# Altium PCB Thunderbolt3.pcbdoc (part 4 of 5)
Units mm, origin at the board's own origin, x right, y up, seen from the top; angles counter-clockwise.
Board outline 43.92 x 41.77 mm, 6 copper layers (TopLayer, MidLayer1, MidLayer2, MidLayer3, MidLayer4, BottomLayer); 211 components, 193 nets, 1132 pads, 744 vias.
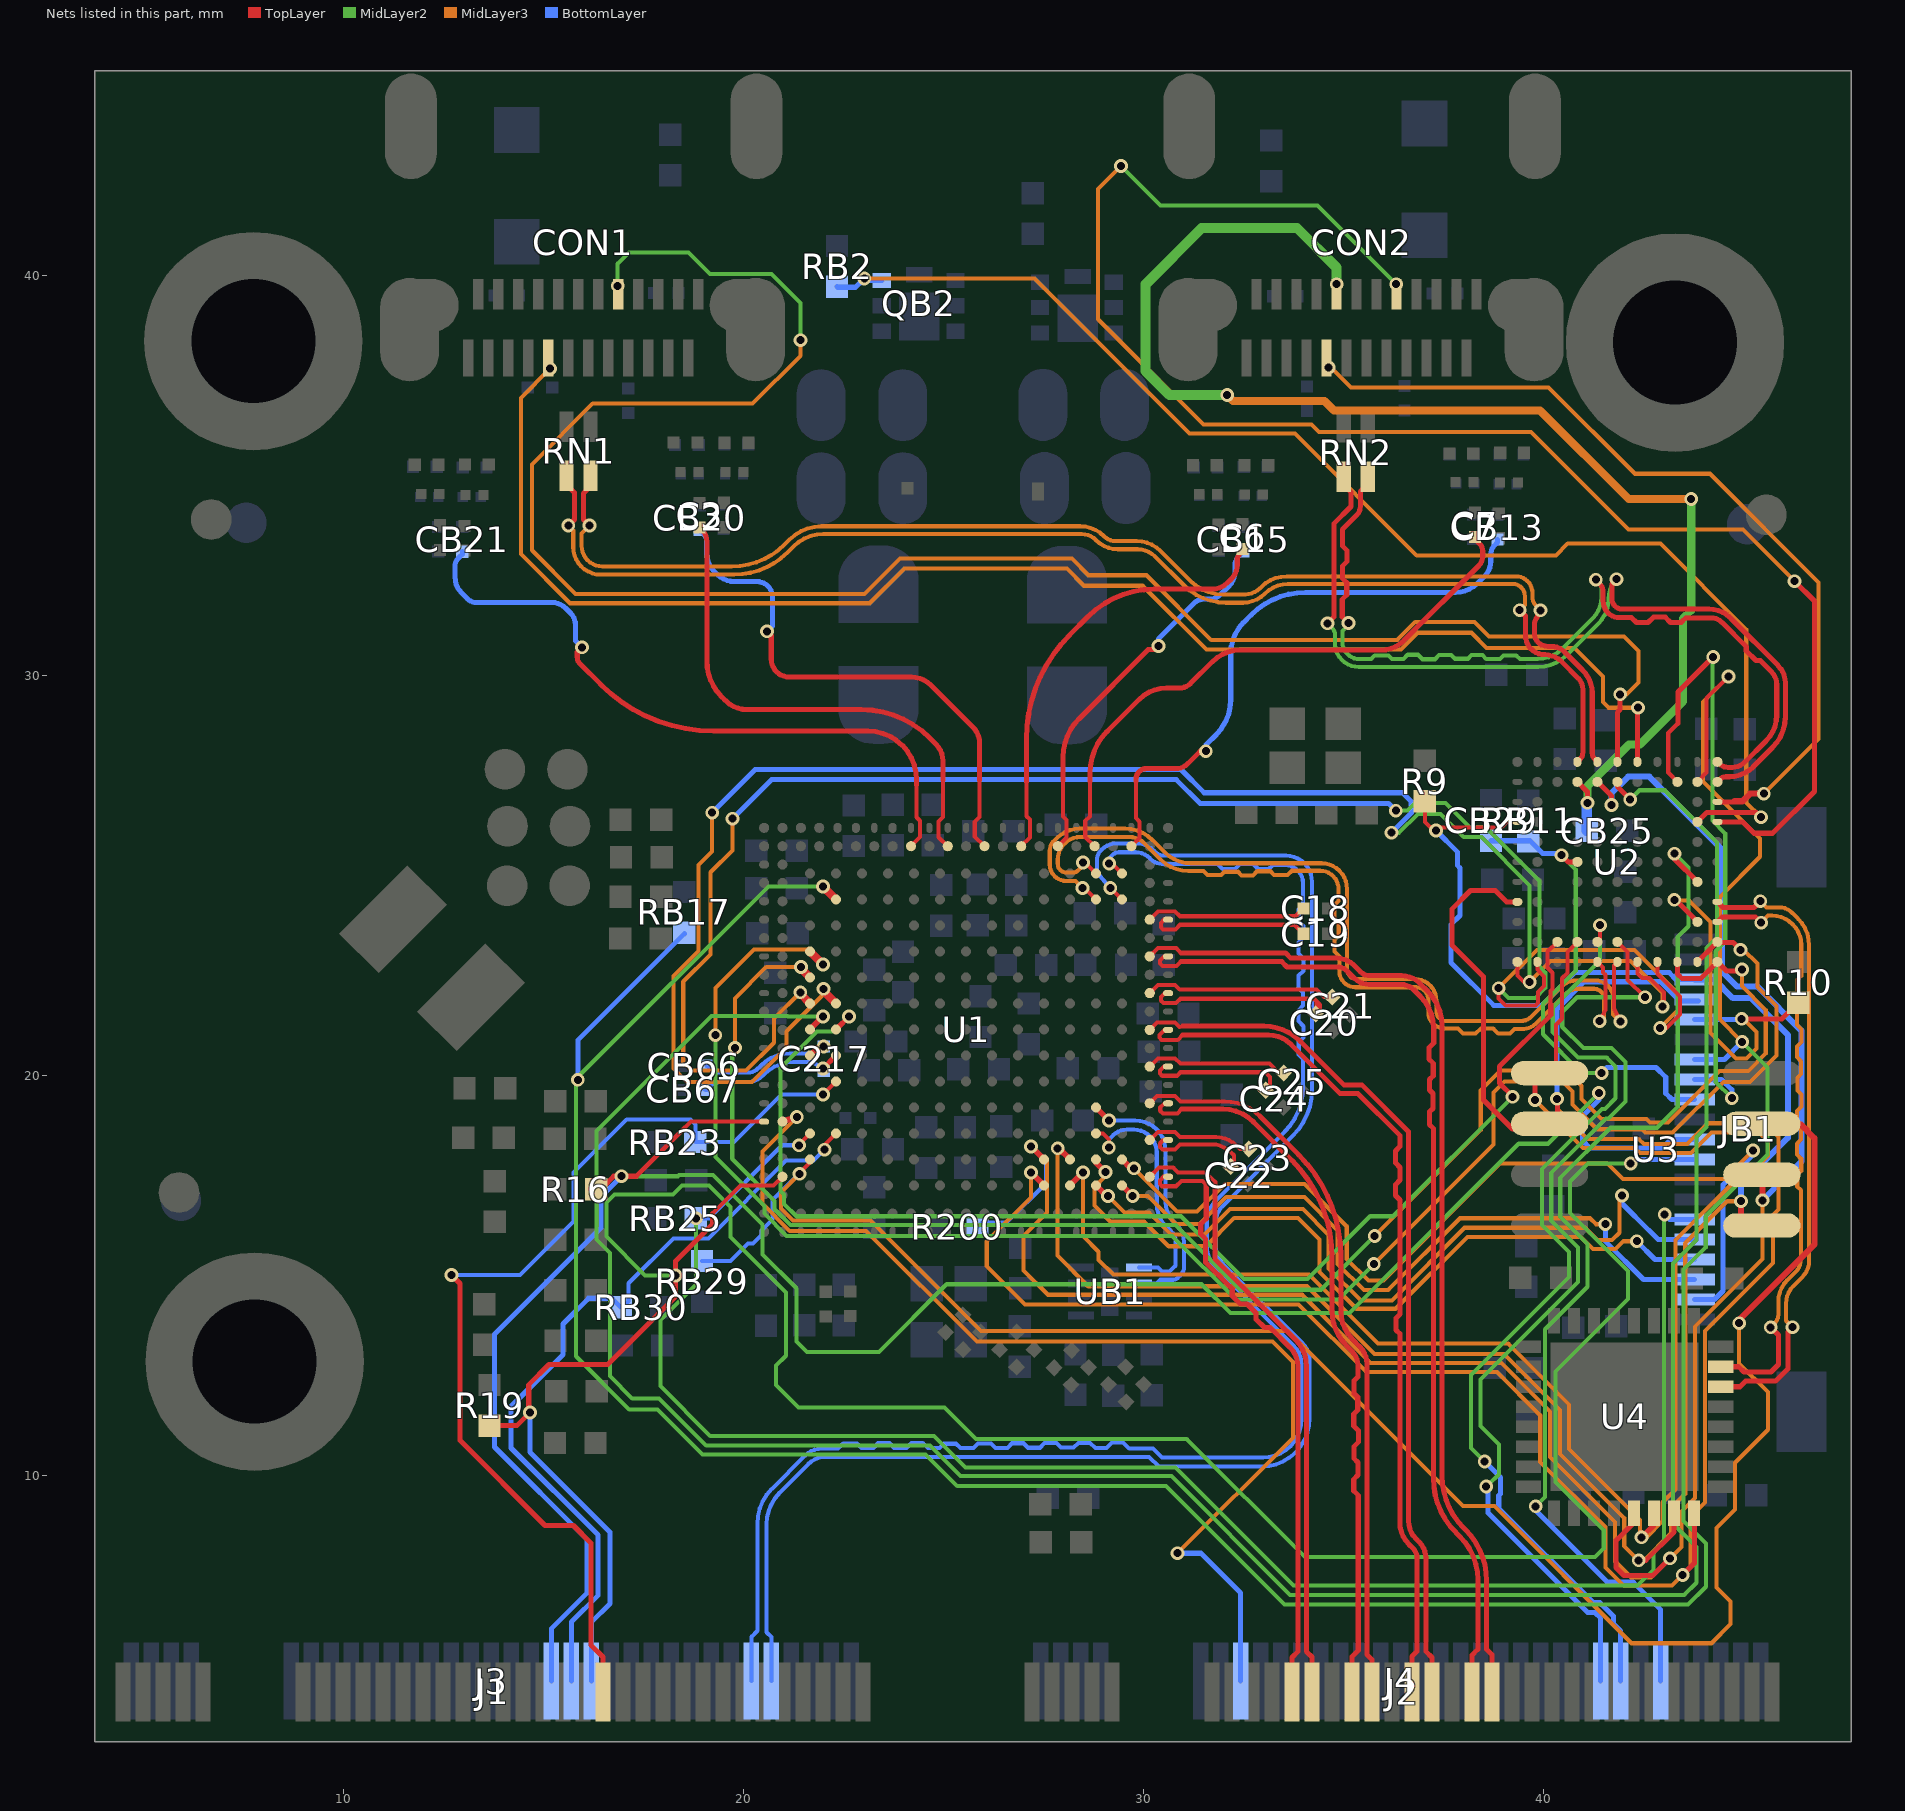
[diagram p8: the nets of this part, all layers, seen from the top]

## Via types
v1: diameter 0.343, hole 0.2, TopLayer to BottomLayer, tented both sides, 632 vias
v2: diameter 0.8, hole 0.8, TopLayer to BottomLayer, 112 vias

## Nets (pads, with @x,y where several pads share a name; then routed paths per layer and width w, separated by ;. In a path a pad name is that pad's centre, name@x,y a point inside that pad or via, vN(x,y) a via of type N, cw(c..) or ccw(c..) an arc to the next point about the centre after c; other vN are vias at no path point) (continued)
U1-B9: CB21.1 U1.B9 | length 16.9
  TopLayer w0.102: U1.B9@24.183,25.742 24.41,25.969 24.41,26.378 24.323,26.465 24.323,27.273
  TopLayer w0.127: v1(15.958,30.713) 15.838,30.594 15.838,30.471 ccw(c16.073,30.471) 15.907,30.305 16.424,29.788 ccw(c19.243,32.607) 19.243,28.62 23.1,28.62 cw(c23.1,27.398) 24.323,27.398 24.323,27.273
  BottomLayer w0.127: CB21.1@12.965,33.103 12.965,33.04 12.871,32.945 ccw(c13.082,32.734) 12.783,32.734 12.783,32.468 ccw(c13.338,32.468) 12.946,32.075 13.094,31.927 ccw(c13.316,32.149) 13.316,31.835 15.206,31.835 cw(c15.206,31.358) 15.543,31.696 15.68,31.558 cw(c15.407,31.285) 15.793,31.285 15.793,30.878 v1(15.958,30.713)
U1-B11: C3.1 U1.B11 | length 12.8
  TopLayer w0.102: 24.98,27.398 24.98,26.468 24.87,26.358 24.87,25.965 25.094,25.742 U1.B11@25.101,25.742
  TopLayer w0.127: C3.1@18.898,33.706 18.961,33.642 cw(c18.679,33.36) 19.078,33.36 19.078,30.373 ccw(c20.345,30.373) 19.449,29.476 19.546,29.38 ccw(c20.088,29.922) 20.088,29.155 22.948,29.155 cw(c22.948,26.752) 24.647,28.451 24.809,28.289 cw(c24.395,27.875) 24.98,27.875 24.98,27.398
U1-B13: CB20.1 U1.B13 | length 13.5
  TopLayer w0.102: 25.898,27.38 25.898,26.468 25.775,26.345 25.775,25.985 U1.B13@26.019,25.742
  TopLayer w0.127: v1(20.583,31.113) 20.688,31.008 20.688,30.423 ccw(c21.14,30.423) 21.14,29.97 24.19,29.97 cw(c24.19,29.275) 24.682,29.766 25.732,28.716 cw(c25.331,28.315) 25.898,28.315 25.898,27.38
  BottomLayer w0.127: CB20.1@18.903,33.643 19.004,33.542 cw(c18.842,33.38) 19.071,33.38 19.071,33.08 ccw(c19.741,33.08) 19.267,32.606 19.335,32.538 ccw(c19.771,32.973) 19.771,32.358 20.331,32.358 cw(c20.331,31.97) 20.718,31.97 20.718,31.249 v1(20.583,31.113)
U1-B15: C6.1 U1.B15 | length 11
  TopLayer w0.102: U1.B15@26.937,25.742 27.153,25.957 27.153,26.408 27.07,26.49 27.07,27.353
  TopLayer w0.127: 27.07,27.353 27.07,28.43 cw(c30.725,28.43) 28.141,31.015 28.609,31.482 cw(c30.263,29.828) 30.263,32.168 31.714,32.168 ccw(c31.714,32.704) 32.093,32.325 32.192,32.423 ccw(c31.84,32.775) 32.338,32.775 32.338,32.948 C6.1@32.473,33.173
U1-B17: CB15.1 U1.B17 | length 9.7
  TopLayer w0.102: U1.B17@27.856,25.742 28.07,25.956 28.07,26.4 27.985,26.485 27.985,27.453
  TopLayer w0.127: 27.985,27.39 27.985,27.972 cw(c29.332,27.972) 28.38,28.923 30.115,30.658 30.28,30.658 v1(30.368,30.746)
  BottomLayer w0.127: v1(30.368,30.746) 30.368,30.925 31.269,31.826 cw(c31.491,31.604) 31.491,31.918 31.654,31.918 ccw(c31.654,32.272) 31.904,32.021 32.143,32.26 ccw(c31.81,32.593) 32.281,32.593 32.281,32.743 cw(c32.673,32.743) 32.396,33.02 CB15.1@32.488,33.113
U1-B19: C7.1 U1.B19 | length 14.9
  TopLayer w0.102: 28.653,27.483 28.653,26.485 28.538,26.37 28.538,25.977 U1.B19@28.774,25.742
  TopLayer w0.127: 28.653,27.355 28.653,27.563 cw(c30.138,27.563) 29.088,28.613 29.888,29.412 cw(c30.57,28.73) 30.57,29.695 30.889,29.695 ccw(c30.889,30.096) 31.173,29.813 31.711,30.351 cw(c32.415,29.647) 32.415,30.643 35.934,30.643 ccw(c35.934,31.437) 36.495,30.875 38.382,32.761 ccw(c38.155,32.988) 38.475,32.988 38.475,33.118 ccw(c38.211,33.118) 38.398,33.305 C7.1@38.308,33.395
U1-B21: CB13.1 U1.B21 | length 14.8
  TopLayer w0.102: U1.B21@29.692,25.742 29.9,25.95 29.9,26.353 29.81,26.443 29.81,27.365
  TopLayer w0.127: 29.81,27.365 29.81,27.425 cw(c30.065,27.425) 30.065,27.68 30.803,27.68 ccw(c30.803,28.103) 31.102,27.804 31.413,28.116 v1(31.553,28.116)
  BottomLayer w0.127: v1@31.563,28.105 31.563,28.281 31.817,28.536 ccw(c30.953,29.4) 32.176,29.4 32.176,30.557 cw(c33.277,30.557) 32.498,31.335 32.69,31.527 cw(c34.043,30.174) 34.043,32.088 37.8,32.088 ccw(c37.8,32.856) 38.343,32.313 38.525,32.495 ccw(c38.163,32.858) 38.676,32.858 38.676,33.043 cw(c38.97,33.043) 38.762,33.251 38.843,33.332 CB13.1@38.843,33.405
U1-D19: U1.D19 U2.G11 | length 22.2
  TopLayer w0.102: v1@28.535,25.333 U1.D19@28.808,25.06 ; U2.G11@41.343,22.851 41.483,22.71 41.483,22.585 41.54,22.528 41.54,21.65 v1(41.398,21.366)
  MidLayer3 w0.102: v1(28.48,25.333) 28.48,25.26 28.347,25.126 cw(c28.247,25.226) 28.247,25.085 28.056,25.085 cw(c28.056,25.278) 27.919,25.142 27.916,25.145 cw(c28.073,25.302) 27.851,25.302 27.851,25.4 cw(c28.423,25.4) 28.423,25.973 29.628,25.973 cw(c29.628,25.417) 30.021,25.81 30.422,25.408 ccw(c31.118,26.104) 31.118,25.12 31.493,25.12 31.593,25.02 31.938,25.02 32.021,25.103 32.353,25.103 32.446,25.01 32.733,25.01 32.838,25.115 33.166,25.115 33.261,25.02 33.598,25.02 33.706,25.128 34.408,25.128 cw(c34.408,24.663) 34.873,24.663 34.873,24.37 34.771,24.268 34.771,23.943 34.876,23.838 34.876,23.503 34.771,23.398 34.771,23.108 34.893,22.985 34.893,22.615 ccw(c35.293,22.615) 35.293,22.215 36.808,22.215 cw(c36.808,21.908) 37.116,21.908 37.116,21.595 ccw(c37.523,21.595) 37.523,21.188 37.856,21.188 37.986,21.058 38.298,21.058 38.428,21.188 38.738,21.188 38.863,21.063 39.161,21.063 39.273,21.175 39.508,21.175 ccw(c39.508,21.555) 39.777,21.286 40.518,22.027 cw(c40.881,21.665) 40.881,22.178 41.256,22.178 cw(c41.256,21.925) 41.508,21.925 41.508,21.476 v1(41.398,21.366)
U1-D20: J3.12 U1.D20 | length 41.8
  TopLayer w0.102: v1@29.21,25.308 U1.D20@29.458,25.06
  BottomLayer w0.102: J3.12@20.19,4.868 20.19,5.977 20.341,6.128 20.341,8.804 cw(c21.574,8.804) 20.702,9.676 21.53,10.504 cw(c21.961,10.073) 21.961,10.683 22.361,10.683 22.488,10.81 22.833,10.81 22.941,10.703 23.246,10.703 23.358,10.815 23.643,10.815 23.756,10.703 24.068,10.703 24.191,10.825 24.476,10.825 24.608,10.693 24.891,10.693 25.001,10.803 25.308,10.803 25.418,10.693 25.741,10.693 25.861,10.813 26.181,10.813 26.298,10.695 26.591,10.695 26.711,10.815 26.991,10.815 27.103,10.703 27.406,10.703 27.523,10.82 27.821,10.82 27.936,10.705 28.248,10.705 28.368,10.825 28.661,10.825 28.791,10.695 29.073,10.695 29.211,10.833 29.486,10.833 29.638,10.68 30.236,10.68 30.458,10.458 32.986,10.458 ccw(c32.986,11.418) 33.946,11.418 33.946,12.79 ccw(c33.306,12.79) 33.758,13.243 31.809,15.191 cw(c32.374,15.756) 31.576,15.756 31.576,16.298 cw(c32.438,16.298) 31.828,16.908 33.528,18.607 ccw(c32.422,19.713) 33.986,19.713 33.986,20.42 33.876,20.53 33.876,20.845 33.993,20.963 33.993,21.24 33.866,21.368 33.866,21.638 33.983,21.755 33.983,22.088 33.871,22.2 33.871,22.505 33.991,22.625 33.991,22.938 33.873,23.055 33.873,23.333 33.996,23.455 33.996,23.743 33.876,23.863 33.876,24.155 33.983,24.263 33.983,24.823 ccw(c33.538,24.823) 33.538,25.268 33.228,25.268 33.126,25.165 32.868,25.165 32.738,25.295 32.408,25.295 32.283,25.17 31.976,25.17 31.846,25.3 30.451,25.3 cw(c30.451,25.674) 30.186,25.41 30.157,25.439 ccw(c29.792,25.074) 29.792,25.59 29.381,25.59 ccw(c29.381,25.367) 29.223,25.525 29.135,25.437 v1(29.135,25.308)
U1-E5: JB1.14 RB17.2 U1.E5 U2.B2 | length 81.3
  TopLayer w0.102: U2.B2@43.843,27.351 44.075,27.583 44.075,29.441 v1(44.618,29.983)
  TopLayer w0.203: v1(21.983,24.735) U1.E5@22.308,24.41
  MidLayer2 w0.102: v1(21.983,24.735) 20.616,24.735 15.808,19.928 15.808,12.99 17.138,11.66 17.846,11.66 18.971,10.535 24.548,10.535 25.338,9.745 30.556,9.745 33.521,6.78 43.611,6.78 44.058,7.228 44.058,8.313 43.496,8.875 43.496,15.158 44.051,15.713 44.051,16.49 45.598,18.038 45.598,20.213 v1(44.96,20.851)
  MidLayer3 w0.102: v1(44.618,29.983) 43.983,29.349 43.983,27.36 45.411,25.933 45.411,25.478 44.403,24.47 44.403,21.408 v1(44.96,20.851)
  BottomLayer w0.127: v1(15.853,19.901) 15.853,20.89 RB17.2@18.515,23.552 ; JB1.14@43.773,20.411 44.52,20.411 v1(44.96,20.851)
U1-E19: U1.E19 U2.F11 | length 22.6
  TopLayer w0.102: v1@28.523,24.695 U1.E19@28.808,24.41 ; U2.F11@41.843,22.851 41.755,22.763 41.755,21.683 v1(41.918,21.358)
  MidLayer3 w0.102: v1(28.468,24.695) 28.29,24.873 28.061,24.873 cw(c28.061,25.283) 27.651,25.283 27.651,25.638 cw(c27.958,25.638) 27.741,25.855 27.829,25.943 cw(c28.401,25.371) 28.401,26.18 29.528,26.18 cw(c29.528,25.196) 30.224,25.892 30.528,25.587 ccw(c31.186,26.245) 31.186,25.315 34.441,25.315 cw(c34.441,24.673) 35.083,24.673 35.083,22.668 ccw(c35.333,22.668) 35.333,22.418 36.783,22.418 cw(c36.783,21.883) 37.318,21.883 37.318,21.61 ccw(c37.556,21.61) 37.556,21.373 39.431,21.373 ccw(c39.431,21.74) 39.691,21.48 40.435,22.224 ; 40.435,22.224 cw(c40.823,21.836) 40.823,22.385 41.283,22.385 cw(c41.283,21.93) 41.738,21.93 41.738,21.538 v1(41.918,21.358)
U1-E20: J3.10 U1.E20 | length 41.7
  TopLayer w0.102: v1@29.198,24.67 U1.E20@29.458,24.41
  BottomLayer w0.102: J3.10@20.69,4.868 20.69,5.973 20.573,6.09 20.573,8.79 cw(c21.696,8.79) 20.902,9.584 21.606,10.288 cw(c22.058,9.835) 22.058,10.475 30.136,10.475 30.381,10.23 32.938,10.23 ccw(c32.938,11.44) 34.148,11.44 34.148,12.865 ccw(c33.484,12.865) 33.954,13.335 31.976,15.313 cw(c32.404,15.741) 31.798,15.741 31.798,16.332 cw(c32.374,16.332) 31.967,16.739 33.733,18.505 ccw(c32.585,19.653) 34.208,19.653 34.208,24.85 ccw(c33.553,24.85) 33.553,25.505 30.513,25.505 cw(c30.513,25.837) 30.278,25.602 30.252,25.629 ccw(c29.808,25.185) 29.808,25.813 29.331,25.813 ccw(c29.331,25.27) 28.947,25.654 28.933,25.64 ccw(c29.187,25.387) 28.828,25.387 28.828,25.205 ccw(c29.141,25.205) 28.903,25.003 v1(29.165,24.695)
U1-F22: C18.1 U1.F22 | length 4.1
  TopLayer w0.102: U1.F22@30.151,23.905 30.359,24.113 30.783,24.113 30.905,23.99 33.797,23.99 C18.1@33.993,24.186
U1-F23: C19.1 U1.F23 | length 4.1
  TopLayer w0.102: U1.F23@30.61,23.905 30.508,23.905 30.428,23.825 30.428,23.715 30.481,23.663 30.79,23.663 30.905,23.778 33.768,23.778 C19.1@33.993,23.553
U1-H4: U1.H4 U2.A10 U2.B11 | length 45
  TopLayer w0.127: U2.B11@43.843,22.851 44.327,23.335 44.736,23.335 v1(44.92,23.151)
  TopLayer w0.203: U1.H4@21.658,23.11 v1(21.983,22.785)
  MidLayer2 w0.102: v1(19.29,21.016) 19.29,17.971 20.516,16.745 20.516,16.555 21.071,16 30.713,16 32.303,14.41 34.867,14.41 v1(35.753,15.296)
  MidLayer3 w0.102: v1(19.29,21.016) 19.29,22.2 20.253,23.163 21.605,23.163 v1(21.983,22.785) ; v1(35.753,15.296) 38.743,18.286 38.743,19.583 39.018,19.858 40.471,19.858 40.721,19.608 40.721,19.283 41.338,18.665 42.461,18.665 42.543,18.583 43.226,18.583 44.493,19.85 45.161,19.85 45.816,20.505 45.816,21.75 45.341,22.225 45.341,22.81 45,23.151 v1(44.92,23.151)
U1-H22: J2.29 U1.H22 | length 25.4
  TopLayer w0.102: U1.H22@30.151,22.987 30.357,23.193 30.813,23.193 30.93,23.075
  TopLayer w0.127: 30.93,23.075 33.544,23.075 33.677,22.943 34.833,22.943 cw(c34.833,22.356) 35.248,22.771 35.419,22.6 ccw(c35.648,22.828) 35.648,22.505 36.445,22.505 cw(c36.445,21.867) 36.896,22.318 37.106,22.108 cw(c36.251,21.253) 37.46,21.253 37.46,9.995 ccw(c39.286,9.995) 37.995,8.704 ; 37.995,8.704 38.042,8.657 cw(c36.76,7.375) 38.573,7.375 38.573,5.663 38.708,5.528 J2.29@38.708,4.598
U1-H23: J2.31 U1.H23 | length 25.3
  TopLayer w0.102: U1.H23@30.61,22.987 30.51,22.987 30.408,22.885 30.408,22.81 30.475,22.743 30.818,22.743 30.93,22.855
  TopLayer w0.127: 30.93,22.855 33.453,22.855 33.585,22.723 34.828,22.723 cw(c34.828,22.343) 35.097,22.611 35.273,22.435 ccw(c35.635,22.798) 35.635,22.285 36.439,22.285 cw(c36.439,21.854) 36.744,22.159 36.922,21.982 cw(c36.128,21.188) 37.25,21.188 37.25,20.82 37.133,20.703 37.133,20.418 37.238,20.313 37.238,20.003 37.143,19.908 37.143,19.645 37.23,19.558 37.23,19.185 37.148,19.103 37.148,18.78 37.24,18.688 37.24,9.943 ccw(c39.161,9.943) 37.803,8.585 37.907,8.481 cw(c36.832,7.405) 38.353,7.405 38.353,5.663 38.208,5.518 J2.31@38.208,4.598
U1-J4: U1.J4 U2.A11 U2.C11 | length 42.6
  TopLayer w0.127: U2.C11@43.343,22.851 43.343,22.548 43.453,22.438 43.93,22.438 U2.A11@44.343,22.851 44.57,22.623 v1@44.968,22.623
  TopLayer w0.203: v1@21.398,22.72 U1.J4@21.658,22.46
  MidLayer2 w0.102: v1(19.78,20.701) 19.713,20.634 19.713,17.928 20.773,16.868 20.773,16.665 21.168,16.27 30.801,16.27 32.418,14.653 34.43,14.653 v1(35.775,15.998)
  MidLayer3 w0.102: v1(19.78,20.701) 19.78,21.937 20.563,22.72 v1(21.431,22.72) ; v1(35.775,15.998) 38.426,18.649 38.426,19.633 38.926,20.133 40.568,20.133 40.948,19.753 40.948,19.425 41.451,18.923 42.566,18.923 42.658,18.83 43.103,18.83 44.393,20.12 45.116,20.12 45.551,20.555 45.551,21.65 44.958,22.243 v1(44.958,22.66)
U1-K22: C21.1 U1.K22 | length 4.8
  TopLayer w0.102: U1.K22@30.151,22.069 30.353,22.27 30.788,22.27 30.9,22.158 34.315,22.158 34.502,21.971 C21.1@34.71,21.971
U1-K23: C20.1 U1.K23 | length 4.9
  TopLayer w0.102: U1.K23@30.61,22.069 30.531,22.069 30.433,21.97 30.433,21.878 30.492,21.819 30.811,21.819 30.92,21.928 34.258,21.928 34.408,21.778 C20.1@34.408,21.545 ; C20.1@34.323,21.573 34.323,21.863
U1-L4: U1.L4 U2.D11 U2.K11 | length 48.1
  TopLayer w0.102: v1(38.873,22.193) 38.873,21.933 39.05,21.755 39.793,21.755 39.86,21.823 39.86,22.098 40.01,22.248 40.01,22.486 39.843,22.654 U2.K11@39.843,22.851 ; U2.D11@42.843,22.851 42.843,22.55 43.41,21.983 43.41,21.535 43.071,21.196 v1(42.913,21.196)
  TopLayer w0.203: v1@21.415,22.053 U1.L4@21.658,21.81
  MidLayer2 w0.102: v1(36.303,26.631) 36.596,26.631 36.786,26.82 37.541,26.82 38.141,26.22 38.548,26.22 39.896,24.873 39.896,22.728 40.038,22.585 40.038,22.198 39.791,21.95 39.116,21.95 v1(38.873,22.193)
  MidLayer3 w0.102: v1(19.718,26.428) 19.718,25.635 19.173,25.09 19.173,23.038 18.488,22.353 18.488,20.345 18.703,20.13 20.061,20.13 20.758,20.828 20.758,21.433 v1(21.415,22.09) ; v1(38.873,22.193) 39.83,23.15 42.266,23.15 43.358,22.058 43.358,21.641 v1(42.913,21.196)
  BottomLayer w0.127: v1(19.718,26.428) 20.695,27.405 30.813,27.405 31.406,26.813 36.121,26.813 v1(36.303,26.631)
U1-L5: U1.L5 U2.E11 U2.L11 | length 44.9
  TopLayer w0.102: U2.L11@39.343,22.851 39.343,22.508 39.505,22.346 v1(39.65,22.346) ; U2.E11@42.343,22.851 42.343,22.563 42.458,22.448 42.642,22.448 43.008,22.082 v1@43.008,21.708
  TopLayer w0.203: v1@21.983,22.135 U1.L5@22.308,21.81
  MidLayer2 w0.102: v1(36.193,26.078) 36.386,26.078 36.853,26.545 37.423,26.545 38.001,25.968 38.446,25.968 39.65,24.763 v1(39.65,22.346)
  MidLayer3 w0.102: v1(19.21,26.578) 19.21,25.61 18.873,25.273 18.873,23.12 18.246,22.493 18.246,20.183 18.581,19.848 20.211,19.848 21.071,20.708 21.071,21.115 21.996,22.04 v1(21.996,22.175) ; v1(39.65,22.346) 40.175,22.87 42.171,22.87 42.971,22.07 v1(42.971,21.73)
  BottomLayer w0.127: v1(19.21,26.578) 20.29,27.658 30.931,27.658 31.511,27.078 36.468,27.078 36.688,26.858 36.688,26.574 v1(36.193,26.078)
U1-M4: U1.M4 U2.F2 | length 65.7
  TopLayer w0.127: U2.F2@41.843,27.351 41.843,27.231 v1(42.163,26.911)
  TopLayer w0.152: U1.M4@21.658,21.16 v1(21.983,21.485)
  MidLayer2 w0.102: v1(21.983,21.485) 21.106,21.485 21.093,21.498 19.196,21.498 16.321,18.623 16.321,15.905 16.658,15.568 16.658,12.493 17.213,11.938 17.886,11.938 19.063,10.76 24.656,10.76 25.423,9.993 30.691,9.993 33.658,7.025 43.513,7.025 43.816,7.328 43.816,8.223 43.236,8.803 43.236,15.313 43.816,15.893 43.816,18.475 44.066,18.725 44.066,23.198 44.328,23.46 44.328,25.838 43.026,27.14 42.392,27.14 v1(42.163,26.911)
U1-M5: U1.M5 U2.J10 | length 31.8
  TopLayer w0.102: 40.175,21.788 40.175,22.125 40.22,22.17 40.22,22.578 40.095,22.703 40.095,23.103 U2.J10@40.343,23.351
  TopLayer w0.127: U1.M5@22.308,21.16 v1@22.665,21.518 ; v1@39.238,19.476 38.895,19.818 38.895,20.238 40.175,21.518 40.175,21.788
  MidLayer2 w0.102: v1(22.633,21.485) 22.258,21.11 21.836,21.11 20.918,20.193 20.918,17.123 21.011,17.03 21.011,16.795 21.316,16.49 30.936,16.49 32.508,14.918 34.091,14.918 35.663,16.49 36.232,16.49 v1(39.218,19.476)
U1-M22: J2.35 U1.M22 | length 21.8
  TopLayer w0.102: U1.M22@30.151,21.151 30.333,21.333 30.783,21.333 30.898,21.218 30.973,21.243
  TopLayer w0.127: 30.973,21.243 33.003,21.243 cw(c33.003,19.956) 33.913,20.866 35.004,19.775 35.452,19.775 36.623,18.604 36.623,8.866 ccw(c37.244,8.866) 36.805,8.427 36.889,8.342 cw(c36.495,7.948) 37.053,7.948 37.053,5.613 37.208,5.458 J2.35@37.208,4.598
U1-M23: J2.37 U1.M23 | length 21.8
  TopLayer w0.102: U1.M23@30.61,21.151 30.521,21.151 30.393,21.023 30.393,20.955 30.446,20.902 30.852,20.902 30.973,21.023
  TopLayer w0.127: 30.973,21.023 33.12,21.023 cw(c33.12,20.237) 33.675,20.793 34.913,19.555 35.36,19.555 36.403,18.513 36.403,18.233 36.293,18.123 36.293,17.828 36.41,17.71 36.41,17.395 36.293,17.278 36.293,17.01 36.408,16.895 36.408,14.043 36.308,13.943 36.308,13.648 36.403,13.553 36.403,8.847 ccw(c37.197,8.847) 36.635,8.285 36.732,8.189 cw(c36.489,7.945) 36.833,7.945 36.833,5.613 36.708,5.488 J2.37@36.708,4.598
U1-N4: C217.1 CB66.1 U1.N4 | length 3.6
  TopLayer w0.127: U1.N4@21.658,20.51 21.883,20.735 v1(22,20.735)
  BottomLayer w0.102: CB66.1@19.07,20.253 19.18,20.143 ccw(c19.326,20.288) 19.326,20.083 20.107,20.083 ccw(c20.107,20.441) 20.361,20.188 20.433,20.26 cw(c21.158,19.534) 21.158,20.56 21.663,20.56 ccw(c21.663,20.952) 21.94,20.675 v1(22,20.735)
U1-N5: C217.2 CB67.1 U1.N5 | length 3.6
  TopLayer w0.127: v1@21.975,20.095 21.975,20.178 U1.N5@22.308,20.51
  BottomLayer w0.102: CB67.1@19.038,19.648 19.083,19.648 19.202,19.767 cw(c19.386,19.583) 19.386,19.843 20.08,19.843 ccw(c20.08,20.406) 20.478,20.008 20.507,20.037 cw(c21.246,19.298) 21.246,20.343 21.641,20.343 cw(c21.641,20.035) C217.2@21.858,20.253
  other v1: 21.983,20.185
U1-P22: C25.1 U1.P22 | length 3.6
  TopLayer w0.102: U1.P22@30.151,20.232 30.356,20.438 30.785,20.438 30.915,20.308 33.14,20.308 33.372,20.076 C25.1@33.498,20.076
U1-P23: C24.1 U1.P23 | length 3.6
  TopLayer w0.102: U1.P23@30.61,20.232 30.505,20.232 30.408,20.135 30.408,20.058 30.463,20.002 30.828,20.002 30.915,20.09 33.043,20.09 33.163,19.97 33.163,19.756 C24.1@33.048,19.641
U1-R5: J1.27 RB23.2 U1.R5 | length 25.5
  TopLayer w0.102: v1(21.983,19.535) U1.R5@22.308,19.86
  TopLayer w0.127: v1(12.695,15.021) 12.905,14.81 12.905,10.888 15.035,8.758 15.743,8.758 16.178,8.323 16.178,5.773 16.48,5.47 J1.27@16.48,4.598
  BottomLayer w0.102: v1(12.695,15.021) 14.409,15.021 15.751,16.363 15.751,17.58 17.076,18.905 18.666,18.905 18.79,18.78 RB23.2@18.79,18.345 19.758,18.345 20.948,19.535 v1(21.983,19.535)
U1-T19: U1.T19 UB1.6 | length 6.7
  TopLayer w0.127: U1.T19@28.808,19.21 v1(29.133,18.885)
  BottomLayer w0.102: v1(29.133,18.885) 29.788,18.885 cw(c29.788,18.128) 30.546,18.128 30.546,16.844 ccw(c31.25,16.844) 30.752,16.346 30.836,16.262 cw(c30.426,15.853) 31.006,15.853 31.006,15.213 cw(c30.74,15.213) 30.928,15.025 30.86,14.958 cw(c30.728,15.09) 30.728,14.903 30.418,14.903 30.324,14.808 UB1.6@29.883,14.808
U1-T22: J2.41 U1.T22 | length 18.3
  TopLayer w0.102: U1.T22@30.151,19.314 30.332,19.495 30.788,19.495 30.923,19.36 32.021,19.36 cw(c32.021,18.103) 32.91,18.992
  TopLayer w0.127: 32.91,18.992 33.875,18.026 cw(c31.334,15.485) 34.928,15.485 34.928,14.116 ccw(c35.916,14.116) 35.217,13.417 35.404,13.231 cw(c34.971,12.798) 35.583,12.798 35.583,5.53 35.708,5.405 J2.41@35.708,4.598
U1-T23: J2.43 U1.T23 | length 18.3
  TopLayer w0.102: U1.T23@30.61,19.314 30.522,19.314 30.413,19.205 30.413,19.128 30.48,19.06 30.843,19.06 30.95,19.168
  TopLayer w0.127: 30.95,19.168 31.977,19.168 cw(c31.977,18.092) 32.738,18.853 33.704,17.887 cw(c31.28,15.463) 34.708,15.463 34.708,14.13 ccw(c35.95,14.13) 35.072,13.251 35.207,13.116 cw(c34.854,12.763) 35.353,12.763 35.353,12.473 35.26,12.38 35.26,12.06 35.35,11.97 35.35,11.645 35.25,11.545 35.25,11.248 35.365,11.133 35.365,10.843 35.253,10.73 35.253,10.438 35.358,10.333 35.358,10.02 35.25,9.913 35.25,9.625 35.363,9.513 35.363,5.635 35.208,5.48 J2.43@35.208,4.598
U1-U1: J3.32 JB1.10 R16.2 U1.U1 | length 55.1
  TopLayer w0.102: 18.515,18.693 18.678,18.855 U1.U1@20.51,18.855
  TopLayer w0.127: R16.2@16.47,17.21 16.751,17.491 17.313,17.491 18.515,18.693
  MidLayer2 w0.102: v1(16.943,17.491) 18.354,17.491 18.383,17.52 19.236,17.52 20.471,16.285 20.471,15.538 21.318,14.69 21.318,13.358 21.583,13.093 23.378,13.093 25.076,14.79 31.448,14.79 32.166,14.073 35.146,14.073 39.376,18.303 40.111,18.303 v1(41.378,19.57)
  BottomLayer w0.127: J3.32@15.19,4.868 15.19,6.177 16.088,7.075 16.088,8.4 13.768,10.72 13.768,13.538 16.431,16.2 16.431,16.979 v1(16.943,17.491) ; v1(41.378,19.57) 41.378,19.398 40.968,18.988 40.968,18.385 41.153,18.2 42.973,18.2 43.184,18.411 JB1.10@43.773,18.411
U1-U2: J4.54 U1.U2 | length 28
  TopLayer w0.152: U1.U2@20.969,18.855 v1(21.328,18.973)
  MidLayer3 w0.102: v1(21.328,18.973) 20.466,18.11 20.466,16.81 21.151,16.125 23.058,16.125 25.828,13.355 33.218,13.355 33.731,12.843 33.731,10.951 v1(30.845,8.066)
  BottomLayer w0.127: v1(30.845,8.066) 31.433,8.066 32.425,7.073 J4.54@32.425,4.868
U1-V4: JB1.6 RB25.2 U1.V4 | length 45.1
  TopLayer w0.102: v1@21.38,18.283 U1.V4@21.658,18.56
  MidLayer2 w0.102: v1(18.805,16.438) 18.805,14.785 17.921,13.9 17.921,12.243 19.163,11 24.756,11 25.543,10.213 30.791,10.213 33.748,7.255 42.346,7.255 42.741,7.65 42.741,8.093 43.011,8.363 v1@43.011,16.521
  BottomLayer w0.102: v1(18.805,16.438) 19.133,16.438 20.961,18.265 v1(21.38,18.265)
  BottomLayer w0.127: v1(43.025,16.536) 43.15,16.411 JB1.6@43.773,16.411
U1-V5: J3.30 RB30.1 U1.V5 | length 19.8
  TopLayer w0.102: v1@22.018,18.138 22.018,18.27 U1.V5@22.308,18.56
  BottomLayer w0.102: RB30.1@17.078,14.32 17.123,14.365 17.123,14.815 18.246,15.938 19.121,15.938 21.063,17.88 21.743,17.88 v1(22.018,18.155)
  BottomLayer w0.127: J3.30@15.69,4.868 15.69,6.345 16.361,7.015 16.361,8.52 14.183,10.698 14.183,11.733 15.481,13.03 15.481,13.795 16.126,14.44 16.703,14.44 RB30.1@16.925,14.218
U1-V19: U1.V19 UB1.5 | length 6.4
  TopLayer w0.102: U1.V19@28.808,18.56 28.98,18.56 29.128,18.413 v1(29.128,18.208)
  BottomLayer w0.102: v1(29.128,18.208) 29.128,18.407 29.234,18.514 cw(c29.576,18.172) 29.576,18.655 29.756,18.655 cw(c29.756,18.085) 30.326,18.085 30.326,16.805 ccw(c31.141,16.805) 30.564,16.229 30.726,16.068 cw(c30.551,15.893) 30.798,15.893 30.798,15.253 30.65,15.105 30.456,15.105 30.353,15.208 UB1.5@29.883,15.208
U1-V22: C23.1 U1.V22 | length 2.7
  TopLayer w0.102: U1.V22@30.151,18.396 30.353,18.598 30.783,18.598 30.91,18.47 31.808,18.47 cw(c31.808,17.753) 32.315,18.26 32.402,18.173 C23.1@32.628,18.173
U1-V23: C22.1 U1.V23 | length 2.6
  TopLayer w0.102: U1.V23@30.61,18.396 30.489,18.396 30.408,18.315 30.408,18.223 30.468,18.163 30.785,18.163 30.91,18.288 31.694,18.288 cw(c31.694,17.597) 32.183,18.086 32.253,18.015 32.253,17.816 C22.1@32.17,17.733
U1-W4: RB29.2 U1.W4 U3.3 | length 49
  TopLayer w0.102: v1@21.393,17.57 21.658,17.835 U1.W4@21.658,17.91
  TopLayer w0.152: v1(44.888,13.816) 44.888,13.903 46.765,15.78 46.765,18.443 46.41,18.798 U3.3@45.453,18.798
  MidLayer3 w0.102: v1(21.393,17.553) 20.928,17.088 20.928,16.68 21.228,16.38 23.171,16.38 25.933,13.618 33.608,13.618 37.981,9.245 38.766,9.245 42.196,5.815 44.193,5.815 44.673,6.295 44.673,6.86 44.321,7.213 44.321,8.7 44.783,9.163 44.783,10.328 45.608,11.153 45.608,12.093 44.888,12.813 v1(44.888,13.816)
  BottomLayer w0.102: RB29.2@18.958,15.37 19.673,15.37 20.108,15.805 20.233,15.805 20.446,16.018 20.446,16.138 20.716,16.408 20.716,16.893 v1@21.393,17.57
U1-W16: R200.1 U1.W16 U2.G2 U3.2 U4.5 | length 56.7
  TopLayer w0.127: U2.G2@41.343,27.351 41.693,27.001 v1(41.693,26.773) ; U4.5@42.255,9.068 42.255,8.828 41.805,8.378 41.805,7.71 42.005,7.51 42.727,7.51 v1(43.155,7.938)
  TopLayer w0.152: v1(27.183,18.235) U1.W16@27.508,17.91 ; v1(45.47,16.888) U3.2@45.47,17.603
  MidLayer3 w0.102: v1(27.183,18.235) 27.586,17.833 27.586,16.588 26.998,16 26.998,15.138 27.608,14.528 33.963,14.528 35.668,12.823 38.948,12.823 40.158,11.613 40.158,10.468 41.783,8.843 41.783,7.865 42.183,7.465 42.682,7.465 43.441,8.224 43.441,9.11 43.781,9.45 43.781,13.733 45.47,15.422 v1(45.47,16.888)
  BottomLayer w0.102: R200.1@25.845,16.228 25.955,16.338 26.576,16.338 27.553,17.315 27.553,17.865 v1(27.183,18.235)
  BottomLayer w0.152: v1(41.693,26.773) 41.693,27.065 42.108,27.48 42.638,27.48 44.453,25.665 44.453,22.613 44.831,22.235 45.336,22.235 46.441,21.13 46.441,17.859 v1(45.47,16.888)
U1-W18: JB1.18 R9.2 U1.W18 U2.L4 U3.1 U4.7 | length 56.2
  TopLayer w0.102: R9.2@37.03,26.863 37.03,26.348 37.17,26.208 38.94,26.208 39.083,26.351 U2.L4@39.343,26.351
  TopLayer w0.127: v1(42.373,7.888) 42.551,7.888 43.255,8.593 U4.7@43.255,9.068
  TopLayer w0.152: v1@27.878,18.19 U1.W18@28.158,17.91 ; v1(44.93,16.866) 44.93,16.23 U3.1@45.55,16.23
  MidLayer3 w0.102: v1(27.848,18.19) 27.848,15.505 28.613,14.74 34.083,14.74 35.773,13.05 39.008,13.05 40.411,11.648 40.411,10.545 42.013,8.943 42.013,8.248 v1(42.373,7.888) 42.506,7.888 43.188,8.57 43.188,9.198 43.538,9.548 43.538,15.815 44.589,16.866 v1(44.93,16.866)
  BottomLayer w0.127: v1(37.305,26.136) 37.848,25.593 37.848,25.255 37.908,25.195 37.908,24.008 37.678,23.778 37.678,22.835 38.751,21.763 39.956,21.763 40.773,22.58 43.138,22.58 43.308,22.411 JB1.18@43.868,22.411
  BottomLayer w0.152: JB1.18@43.773,22.411 44.263,22.411 44.731,21.943 45.186,21.943 46.106,21.023 46.106,18.448 44.93,17.272 v1(44.93,16.866)
U1-W19: JB1.4 U1.W19 | length 19.6
  TopLayer w0.152: U1.W19@28.808,17.91 28.808,17.833 v1(29.045,17.595)
  MidLayer3 w0.102: v1(29.045,17.595) 29.045,17.495 28.766,17.215 28.766,16.763 29.176,16.353 30.013,16.353 30.626,15.74 31.553,15.74 32.263,16.45 33.858,16.45 34.398,15.91 34.398,15.098 35.318,14.178 36.296,14.178 38.091,15.973 40.928,15.973 41.228,15.673 41.798,15.673 41.991,15.866 v1(42.328,15.866)
  BottomLayer w0.127: v1(42.328,15.866) 42.783,15.411 JB1.4@43.773,15.411
U1-W20: JB1.2 U1.W20 | length 24.4
  TopLayer w0.152: U1.W20@29.458,17.91 29.68,17.688 v1(29.755,17.688)
  MidLayer3 w0.102: v1(29.755,17.688) 30.838,16.605 31.336,16.605 32.028,17.298 34.018,17.298 35.076,16.24 35.076,15.425 35.616,14.885 35.991,14.885 38.911,17.805 41.593,17.805 41.981,17.418 44.515,17.418 v1(45.23,18.133)
  BottomLayer w0.127: JB1.2@43.773,14.411 44.271,14.411 44.483,14.623 44.483,17.28 45.23,18.027 v1(45.23,18.133)
U1-Y2: J3.28 JB1.9 R19.1 U1.Y2 | length 67.3
  TopLayer w0.102: 19.223,16.555 19.925,17.258 20.749,17.258 U1.Y2@20.969,17.478
  TopLayer w0.127: R19.1@13.645,11.256 14.328,11.256 14.625,11.553 14.625,12.275 15.135,12.785 16.6,12.785 18.3,14.485 18.3,15.37 19.223,16.293 19.223,16.555
  MidLayer2 w0.102: v1(18.3,15.008) 17.538,15.008 16.566,15.98 16.566,16.835 16.768,17.038 18.231,17.038 18.453,17.26 19.133,17.26 19.668,16.725 19.668,15.968 21.056,14.58 21.056,13.003 20.811,12.758 20.811,12.275 21.373,11.713 25.021,11.713 25.811,10.923 31.076,10.923 34.028,7.97 41.283,7.97 41.501,8.188 41.501,8.643 40.293,9.85 40.293,12.608 42.106,14.42 42.106,15.125 40.661,16.57 40.661,17.363 41.109,17.811 v1(42.173,17.811)
  BottomLayer w0.127: v1(14.658,11.586) 14.658,10.593 16.658,8.593 16.658,6.805 16.19,6.337 J3.28@16.19,4.868 ; v1(42.173,17.811) 42.273,17.911 JB1.9@43.773,17.911
U1-Y16: JB1.17 U1.Y16 U2.L8 U3.6 U4.8 | length 61.8
  TopLayer w0.127: U2.L8@39.343,24.351 39.072,24.351 38.79,24.633 38.17,24.633 37.703,24.165 37.703,23.273 38.498,22.478 38.498,19.395 39.22,18.673 40.35,18.673 v1@40.35,19.426 ; v1(43.473,7.523) 43.77,7.821 U4.8@43.77,9.053
  TopLayer w0.152: v1@27.118,17.65 U1.Y16@27.508,17.26
  MidLayer3 w0.102: v1(27.183,17.585) 27.183,16.965 26.076,15.858 26.076,15.245 27.033,14.288 33.873,14.288 35.566,12.595 38.833,12.595 39.913,11.515 39.913,10.35 41.546,8.718 41.546,7.71 42.001,7.255 43.205,7.255 43.673,7.724 43.673,8.98 44.028,9.335 44.028,13.62 45.728,15.32 45.728,16.523 45.868,16.663 45.868,18.478 45.531,18.815 44.108,18.815 43.588,18.295 42.503,18.295 42.376,18.423 41.093,18.423 40.33,19.186 v1(40.33,19.426)
  BottomLayer w0.127: v1(40.33,19.426) 40.33,21.672 41.01,22.352 42.916,22.352 43.393,21.875 JB1.17@43.873,21.875
U1-Y18: U1.Y18 U2.H10 U3.5 U4.6 | length 43.2
  TopLayer w0.102: U3.5@40.148,20.068 40.31,20.231 40.31,21.278 40.46,21.428 40.46,22.44 40.59,22.57 40.59,23.098 U2.H10@40.843,23.351
  TopLayer w0.127: v1@39.78,19.391 U3.5@39.78,20.129 ; v1(42.445,8.463) 42.755,8.773 U4.6@42.755,9.068
  TopLayer w0.152: U1.Y18@28.158,17.26 v1(28.483,17.585)
  MidLayer3 w0.102: v1(28.483,17.585) 28.483,15.993 28.873,15.603 28.873,15.4 29.243,15.03 34.128,15.03 35.853,13.305 39.113,13.305 40.631,11.788 40.631,10.673 42.403,8.9 42.403,8.629 42.569,8.463 42.976,8.87 42.976,9.34 43.298,9.663 43.298,15.895 45.168,17.765 45.376,17.765 45.611,18 45.611,18.353 45.381,18.583 44.196,18.583 43.683,18.07 42.403,18.07 42.273,18.2 40.978,18.2 v1(39.78,19.398)
U1-Y19: JB1.5 U1.Y19 | length 19.6
  TopLayer w0.152: U1.Y19@28.808,17.26 v1@29.085,16.983
  MidLayer3 w0.102: v1(29.108,16.995) 29.52,16.583 30.138,16.583 30.683,16.038 31.523,16.038 32.156,16.67 33.981,16.67 34.626,16.025 34.626,15.185 35.428,14.383 36.203,14.383 38.023,16.203 41.038,16.203 41.348,15.893 41.711,15.893 41.896,16.078 41.896,16.949 v1(41.955,17.008)
  BottomLayer w0.127: v1(41.955,17.008) 41.955,16.811 42.636,16.13 42.643,16.13 42.863,15.911 JB1.5@43.773,15.911
U1-Y20: JB1.3 U1.Y20 | length 18.1
  TopLayer w0.152: U1.Y20@29.458,17.26 v1@29.72,16.998
  MidLayer3 w0.102: v1(29.723,16.998) 30.108,16.998 30.806,16.3 31.393,16.3 32.063,16.97 34.016,16.97 34.848,16.138 34.848,15.3 35.506,14.643 36.113,14.643 37.911,16.44 41.153,16.44 41.303,16.291 v1(41.54,16.291)
  BottomLayer w0.127: v1(41.54,16.291) 41.54,15.863 42.493,14.911 JB1.3@43.773,14.911
U1-Y22: J2.47 U1.Y22 | length 15.6
  TopLayer w0.102: U1.Y22@30.151,17.478 30.381,17.708 30.738,17.708 30.863,17.583 31.543,17.583 31.783,17.343
  TopLayer w0.127: 31.783,17.343 31.783,15.42 31.793,15.41 31.793,15.404 33.8,13.397 cw(c33.141,12.738) 34.073,12.738 34.073,5.605 34.208,5.47 J2.47@34.208,4.598
U1-Y23: J2.49 U1.Y23 | length 15.6
  TopLayer w0.102: U1.Y23@30.61,17.478 30.498,17.478 30.405,17.385 30.405,17.298 30.463,17.24 30.81,17.24 30.945,17.375 31.473,17.375 31.563,17.285
  TopLayer w0.127: 31.563,17.285 31.563,16.428 31.425,16.29 31.425,16.043 31.549,15.919 31.549,15.336 32.213,14.673 32.213,14.498 32.413,14.298 32.585,14.298 32.81,14.073 32.81,13.915 33.018,13.708 33.163,13.708 33.66,13.21 cw(c33.195,12.745) 33.853,12.745 33.853,5.605 33.708,5.46 J2.49@33.708,4.598
U2-A1: RN2.4 U2.A1 | length 22
  TopLayer w0.127: v1(35.12,31.321) 34.963,31.478 34.963,31.913 35.075,32.025 35.075,32.328 34.965,32.438 34.965,32.743 35.078,32.855 35.078,33.138 34.965,33.25 34.965,33.66 35.329,34.024 ccw(c35.12,34.233) 35.415,34.233 35.415,34.61 RN2.4@35.548,34.743 ; v1(41.303,32.406) 41.392,32.317 cw(c41.165,32.09) 41.485,32.09 41.485,31.87 ccw(c41.9,31.87) 41.9,31.455 42.198,31.455 42.32,31.333 42.608,31.333 42.743,31.468 43.038,31.468 43.17,31.335 43.435,31.335 43.55,31.45 44.184,31.45 cw(c44.184,31.066) 44.455,31.338 45.063,30.73 45.063,30.628 45.305,30.385 45.413,30.385 45.689,30.109 cw(c45.361,29.78) 45.825,29.78 45.825,29.018 cw(c44.914,29.018) 45.558,28.373 45.027,27.841 cw(c44.716,28.152) 44.716,27.713 44.605,27.713 cw(c44.605,28.014) 44.392,27.801 U2.A1@44.343,27.851
  MidLayer2 w0.102: v1(35.12,31.321) 35.12,31.277 34.968,31.125 34.968,30.845 ccw(c35.393,30.845) 35.393,30.42 35.688,30.42 35.776,30.508 36.121,30.508 36.206,30.423 36.496,30.423 36.601,30.528 36.858,30.528 36.971,30.415 37.281,30.415 37.386,30.52 37.688,30.52 37.781,30.428 38.106,30.428 38.196,30.518 38.468,30.518 38.563,30.423 38.908,30.423 38.998,30.513 39.313,30.513 39.403,30.423 39.844,30.423 ccw(c39.844,31.302) 40.466,30.68 41.231,31.445 ccw(c40.718,31.958) 41.443,31.958 41.443,32.265 v1(41.303,32.406)
U2-A2: RN2.3 U2.A2 | length 22.4
  TopLayer w0.127: v1(34.593,31.313) 34.753,31.473 34.753,33.803 35.183,34.233 35.183,34.59 35,34.773 RN2.3@35,34.978 ; v1(41.82,32.416) 41.705,32.301 41.705,31.92 ccw(c41.953,31.92) 41.953,31.673 44.127,31.673 cw(c44.127,30.905) 44.67,31.448 45.862,30.256 cw(c45.431,29.825) 46.04,29.825 46.04,28.983 cw(c44.948,28.983) 45.72,28.21 45.234,27.724 cw(c44.64,28.318) 44.64,27.478 44.561,27.478 ccw(c44.561,27.257) 44.405,27.413 U2.A2@44.343,27.351
  MidLayer2 w0.102: v1(34.593,31.313) 34.712,31.194 cw(c34.545,31.028) 34.781,31.028 34.781,30.818 ccw(c35.376,30.818) 35.376,30.223 39.855,30.223 ccw(c39.855,31.256) 40.586,30.525 41.369,31.309 ccw(c40.763,31.916) 41.621,31.916 41.621,31.934 cw(c42.302,31.934) v1(41.82,32.416)
U2-A3: CON2.A8 U2.A3 | length 21.6
  TopLayer w0.127: U2.A3@44.343,26.851 44.751,26.851
  TopLayer w0.152: 44.765,26.865 44.968,26.865 45.158,27.056 v1(45.503,27.056)
  MidLayer3 w0.102: v1@34.608,37.788 35.186,37.21 40.123,37.21 42.281,35.053 44.153,35.053 46.871,32.335 46.871,28.424 v1(45.503,27.056)
  other v1: 34.618,37.708
U2-A4: CON2.B8 U2.A4 | length 40.7
  TopLayer w0.127: U2.A4@44.343,26.351 44.972,26.351 45.258,26.065 45.723,26.065 46.768,27.11 46.768,31.87 v1(46.27,32.368)
  MidLayer2 w0.102: v1(29.43,42.748) 30.416,41.763 34.343,41.763 v1(36.313,39.793)
  MidLayer3 w0.102: v1(29.43,42.748) 28.858,42.176 28.858,38.915 31.493,36.28 34.193,36.28 34.381,36.093 39.681,36.093 42.116,33.658 44.981,33.658 v1(46.27,32.368)
U2-A8: U2.A8 U4.14 | length 15.8
  TopLayer w0.127: U2.A8@44.343,24.351 44.483,24.21 45.257,24.21 v1(45.415,24.368) ; U4.14@44.428,12.228 44.906,12.228 45.05,12.373 45.803,12.373 46.103,12.673 46.103,13.598 v1(46.22,13.716)
  MidLayer3 w0.102: v1(45.415,24.368) 45.571,24.213 45.886,24.213 cw(c45.886,23.754) 46.21,24.078 46.36,23.928 cw(c45.694,23.263) 46.636,23.263 46.636,15.373 cw(c46.074,15.373) 46.471,14.976 46.234,14.739 ccw(c46.66,14.313) 46.058,14.313 46.058,13.878 v1(46.22,13.716)
U2-A9: U2.A9 U4.15 | length 15.7
  TopLayer w0.127: U2.A9@44.343,23.851 44.467,23.975 45.288,23.975 v1(45.435,23.828) ; U4.15@44.428,12.728 44.875,12.728 45.008,12.595 45.68,12.595 45.87,12.785 45.87,13.519 v1(45.675,13.713)
  MidLayer3 w0.102: v1(45.435,23.828) 45.612,24.005 45.706,24.005 cw(c45.706,23.273) 46.438,23.273 46.438,22.5 46.343,22.405 46.343,22.085 46.443,21.985 46.443,21.67 46.333,21.56 46.333,21.275 46.448,21.16 46.448,20.845 46.333,20.73 46.333,20.468 46.436,20.365 46.436,20.048 46.341,19.953 46.341,19.638 46.441,19.538 46.441,19.233 46.331,19.123 46.331,18.845 46.436,18.74 46.436,18.408 46.331,18.303 46.331,18.035 46.438,17.928 46.438,17.623 46.338,17.523 46.338,17.233 46.43,17.141 46.43,15.413 cw(c46.002,15.413) 46.305,15.11 46.09,14.895 ccw(c46.634,14.352) 45.865,14.352 45.865,14.023 cw(c45.608,14.023) 45.79,13.841 ; v1(45.675,13.713) 45.8,13.838
U2-B4: QB2.3 RB2.2 U2.B4 | length 33.7
  TopLayer w0.127: U2.B4@43.843,26.351 44.08,26.588 45.311,26.588 v1(45.433,26.466)
  MidLayer3 w0.102: v1(23.015,39.933) 27.27,39.933 31.143,36.06 33.778,36.06 36.826,33.013 40.308,33.013 40.601,33.305 42.921,33.305 45.063,31.163 45.063,26.835 v1(45.433,26.466)
  BottomLayer w0.127: RB2.2@22.333,39.73 22.348,39.715 22.797,39.715 22.967,39.885 QB2.3@23.45,39.885
U2-B7: J4.12 U2.B7 | length 26.3
  TopLayer w0.127: v1(43.27,25.556) 43.27,25.423 U2.B7@43.843,24.851
  MidLayer2 w0.102: v1(39.8,9.238) 40.036,9.474 40.036,13.665 41.098,14.728 41.098,15.798 40.413,16.483 40.413,17.45 41.666,18.703 42.833,18.703 43.351,19.22 43.351,23.473 43.618,23.74 43.618,25.208 v1(43.27,25.556)
  BottomLayer w0.127: v1(39.8,9.238) 39.8,9.133 41.593,7.34 42.238,7.34 42.925,6.653 J4.12@42.925,4.868
U2-B9: JB1.16 R10.2 U2.B9 | length 9.8
  TopLayer w0.127: v1@43.293,24.401 U2.B9@43.843,23.851 ; v1(44.95,21.426) 45.955,21.426 R10.2@46.36,21.831
  MidLayer3 w0.102: v1@43.286,24.38 43.636,24.38 44.171,23.845 44.171,21.07 44.808,20.433 45.068,20.433 45.323,20.688 45.323,21.095 44.993,21.426 v1(44.95,21.426)
  BottomLayer w0.127: JB1.16@43.773,21.411 v1@44.935,21.411
  other v1: 43.265,24.401
U2-C2: JB1.13 U2.C2 | length 16.4
  TopLayer w0.102: U2.C2@43.343,27.351 43.114,27.579 43.114,28.571 43.358,28.815
  TopLayer w0.127: 43.358,28.815 43.358,29.596 v1(44.235,30.473)
  MidLayer2 w0.102: v1(44.235,30.473) 44.216,30.454 44.216,26.383 44.538,26.06 44.538,23.353 44.301,23.115 44.301,19.843 v1(44.703,19.441)
  BottomLayer w0.127: JB1.13@43.773,19.911 44.448,19.911 44.703,19.656 v1(44.703,19.441)
U2-E1: CON1.A8 U2.E1 | length 37.2
  TopLayer w0.127: U2.E1@42.343,27.851 v1@42.343,29.191
  MidLayer3 w0.102: v1(15.158,37.678) 14.428,36.949 14.428,33.045 15.658,31.815 23.148,31.815 24.016,32.683 28.078,32.683 28.508,32.253 29.976,32.253 31.571,30.658 36.431,30.658 36.851,31.078 38.191,31.078 38.571,30.698 40.768,30.698 41.481,29.985 41.481,29.345 41.623,29.203 v1(42.355,29.203)
U2-F1: CON1.B8 U2.F1 | length 50
  TopLayer w0.127: U2.F1@41.843,27.851 41.843,29.088 41.913,29.158 v1(41.913,29.538)
  MidLayer2 w0.102: v1(16.848,39.751) 16.848,40.302 17.128,40.583 18.618,40.583 19.153,40.048 20.693,40.048 21.418,39.323 v1(21.418,38.391)
  MidLayer3 w0.102: v1(21.418,38.391) 21.418,38.002 20.223,36.808 16.226,36.808 14.703,35.285 14.703,33.14 15.796,32.048 23.021,32.048 23.903,32.93 28.208,32.93 28.623,32.515 30.071,32.515 31.688,30.898 36.338,30.898 36.788,31.348 38.266,31.348 38.631,30.983 42.008,30.983 42.368,30.623 42.368,29.838 42.069,29.538 v1(41.913,29.538)
U2-F10: J4.18 U2.F10 | length 25.3
  TopLayer w0.102: U2.F10@41.843,23.351 42.098,23.095 42.098,22.398 v1(42.53,21.966)
  MidLayer2 w0.102: v1@38.621,9.783 38.878,10.04 38.878,10.785 38.416,11.248 38.416,12.41 40.856,14.85 40.856,15.713 40.188,16.38 40.188,17.57 41.553,18.935 41.618,18.935 42.043,19.36 42.043,20.348 41.693,20.698 40.993,20.698 40.463,21.228 40.463,21.59 40.839,21.966 v1(42.53,21.966)
  BottomLayer w0.127: v1(38.563,9.733) 38.611,9.685 38.611,9.073 41.098,6.585 41.278,6.585 41.425,6.438 J4.18@41.425,4.868
U2-G1: RN1.4 U2.G1 | length 32.4
  TopLayer w0.127: v1(16.145,33.758) 15.995,33.908 15.995,34.563 16.173,34.74 RN1.4@16.173,35.001 ; v1(39.92,31.638) 39.809,31.428 ccw(c40.145,31.251) 39.765,31.251 39.765,31.073 ccw(c40.1,31.073) 40.1,30.738 40.182,30.738 cw(c40.182,30.26) 40.52,30.598 40.972,30.146 cw(c40.392,29.565) 41.213,29.565 41.213,28.075 ccw(c41.442,28.075) 41.28,27.913 U2.G1@41.343,27.851
  MidLayer3 w0.102: v1(16.145,33.758) 15.948,33.561 15.948,33.255 ccw(c16.468,33.255) 16.468,32.735 19.701,32.735 ccw(c19.701,34.606) 21.024,33.283 21.15,33.41 cw(c21.948,32.612) 21.948,33.74 28.408,33.74 cw(c28.408,32.889) 29.01,33.491 29.013,33.487 ; 29.012,33.489 ccw(c29.299,33.776) 29.299,33.37 29.82,33.37 cw(c29.82,32.517) 30.423,33.12 31.173,32.37 ccw(c31.976,33.172) 31.976,32.038 32.541,32.038 ccw(c32.541,32.551) 32.903,32.188 32.94,32.224 ; 32.94,32.224 cw(c33.576,31.588) 33.576,32.488 39.306,32.488 cw(c39.306,32.075) 39.718,32.075 39.718,31.975 ccw(c40.044,31.975) 39.814,31.745 v1(39.92,31.638)
U2-G10: J4.16 U2.G10 | length 24.7
  TopLayer w0.102: U2.G10@41.343,23.351 41.405,23.413 v1(41.405,23.768)
  MidLayer2 w0.102: v1(38.525,10.358) 38.186,10.698 38.186,12.523 40.635,14.972 40.635,15.601 39.961,16.275 39.961,17.67 41.461,19.17 41.528,19.17 41.798,19.44 41.798,20.238 41.576,20.46 40.861,20.46 40.226,21.095 40.226,21.703 41.405,22.882 v1(41.405,23.768)
  BottomLayer w0.127: v1(38.525,10.358) 38.921,9.963 38.921,9.553 38.876,9.508 38.876,9.193 41.233,6.835 41.403,6.835 41.746,6.493 41.746,6.3 41.925,6.121 J4.16@41.925,4.868
U2-H1: RN1.3 U2.H1 | length 32.4
  TopLayer w0.127: RN1.3@15.573,35.001 15.573,34.773 15.768,34.578 15.768,33.911 v1(15.615,33.758) ; v1(39.4,31.643) 39.545,31.498 39.545,31.01 ccw(c40.025,31.01) 40.025,30.53 cw(c40.025,29.933) 40.448,30.355 40.867,29.937 cw(c40.598,29.668) 40.978,29.668 40.978,28.088 cw(c40.732,28.088) 40.906,27.914 U2.H1@40.843,27.851
  MidLayer3 w0.102: v1(15.615,33.758) 15.738,33.635 15.738,33.223 ccw(c16.431,33.223) 16.431,32.53 19.753,32.53 ccw(c19.753,34.425) 21.093,33.085 21.24,33.232 cw(c21.996,32.477) 21.996,33.545 28.451,33.545 cw(c28.451,33.05) 28.801,33.4 28.809,33.392 ccw(c29.356,33.938) 29.356,33.165 29.843,33.165 cw(c29.843,32.538) 30.287,32.981 31.003,32.265 ccw(c32.059,33.321) 32.059,31.828 32.478,31.828 ccw(c32.478,32.612) 33.033,32.058 33.037,32.062 cw(c33.601,31.499) 33.601,32.295 39.231,32.295 cw(c39.231,31.998) 39.528,31.998 39.528,31.771 v1(39.4,31.643)
U2-H2: CB25.2 CON2.B5 U2.H2 | length 33.5
  TopLayer w0.127: U2.H2@40.843,27.351 41.095,27.098 v1(41.095,26.826)
  MidLayer2 w0.203: v1(41.095,26.826) 41.095,27.242 42.133,28.28 42.406,28.28 43.483,29.358 43.483,31.435 43.688,31.64 v1(43.688,34.421)
  MidLayer2 w0.254: v1(32.085,37.023) 30.643,37.023 30.048,37.618 30.048,39.79 31.453,41.195 33.833,41.195 34.823,40.206 v1(34.823,39.793)
  MidLayer3 w0.203: v1(32.085,37.023) 32.236,36.873 34.518,36.873 34.753,36.638 39.908,36.638 42.125,34.421 v1(43.688,34.421)
  BottomLayer w0.254: CB25.2@41.075,26.128 41.075,26.806 v1(41.095,26.826)
U2-H6: CB29.1 JB1.12 RB11.2 U2.H6 | length 12.1
  TopLayer w0.127: v1(40.443,25.516) 40.608,25.351 U2.H6@40.843,25.351
  MidLayer2 w0.102: v1(40.443,25.516) 40.801,25.158 40.801,22.623 39.981,21.803 39.981,21.04 40.948,20.073 v1(41.448,20.073)
  BottomLayer w0.127: CB29.1@38.683,25.878 39.656,25.878 39.973,25.56 v1@40.398,25.56 ; v1(41.448,20.073) 41.582,20.208 42.808,20.208 43.051,19.965 43.051,19.565 43.205,19.411 JB1.12@43.773,19.411

## Text inside footprints (layer, text, board x,y; h text height)
U1: TopOverlay "A1" at 19.019,26.79 h0.64
U2: TopOverlay "11" at 44.485,21.478 h0.64; TopOverlay "1" at 45.181,27.66 h0.56; TopOverlay "L" at 39.217,28.478 h0.56; TopOverlay "A" at 43.921,28.554 h0.56